# Altium PCB EXPLORER_V3.4.PcbDoc (part 2 of 4)
Units mm, origin at the board's own origin, x right, y up, seen from the top; angles counter-clockwise.
Board outline 160 x 121.01 mm, 2 copper layers (Top Layer, Bottom Layer); 254 components, 245 nets, 1181 pads, 772 vias.
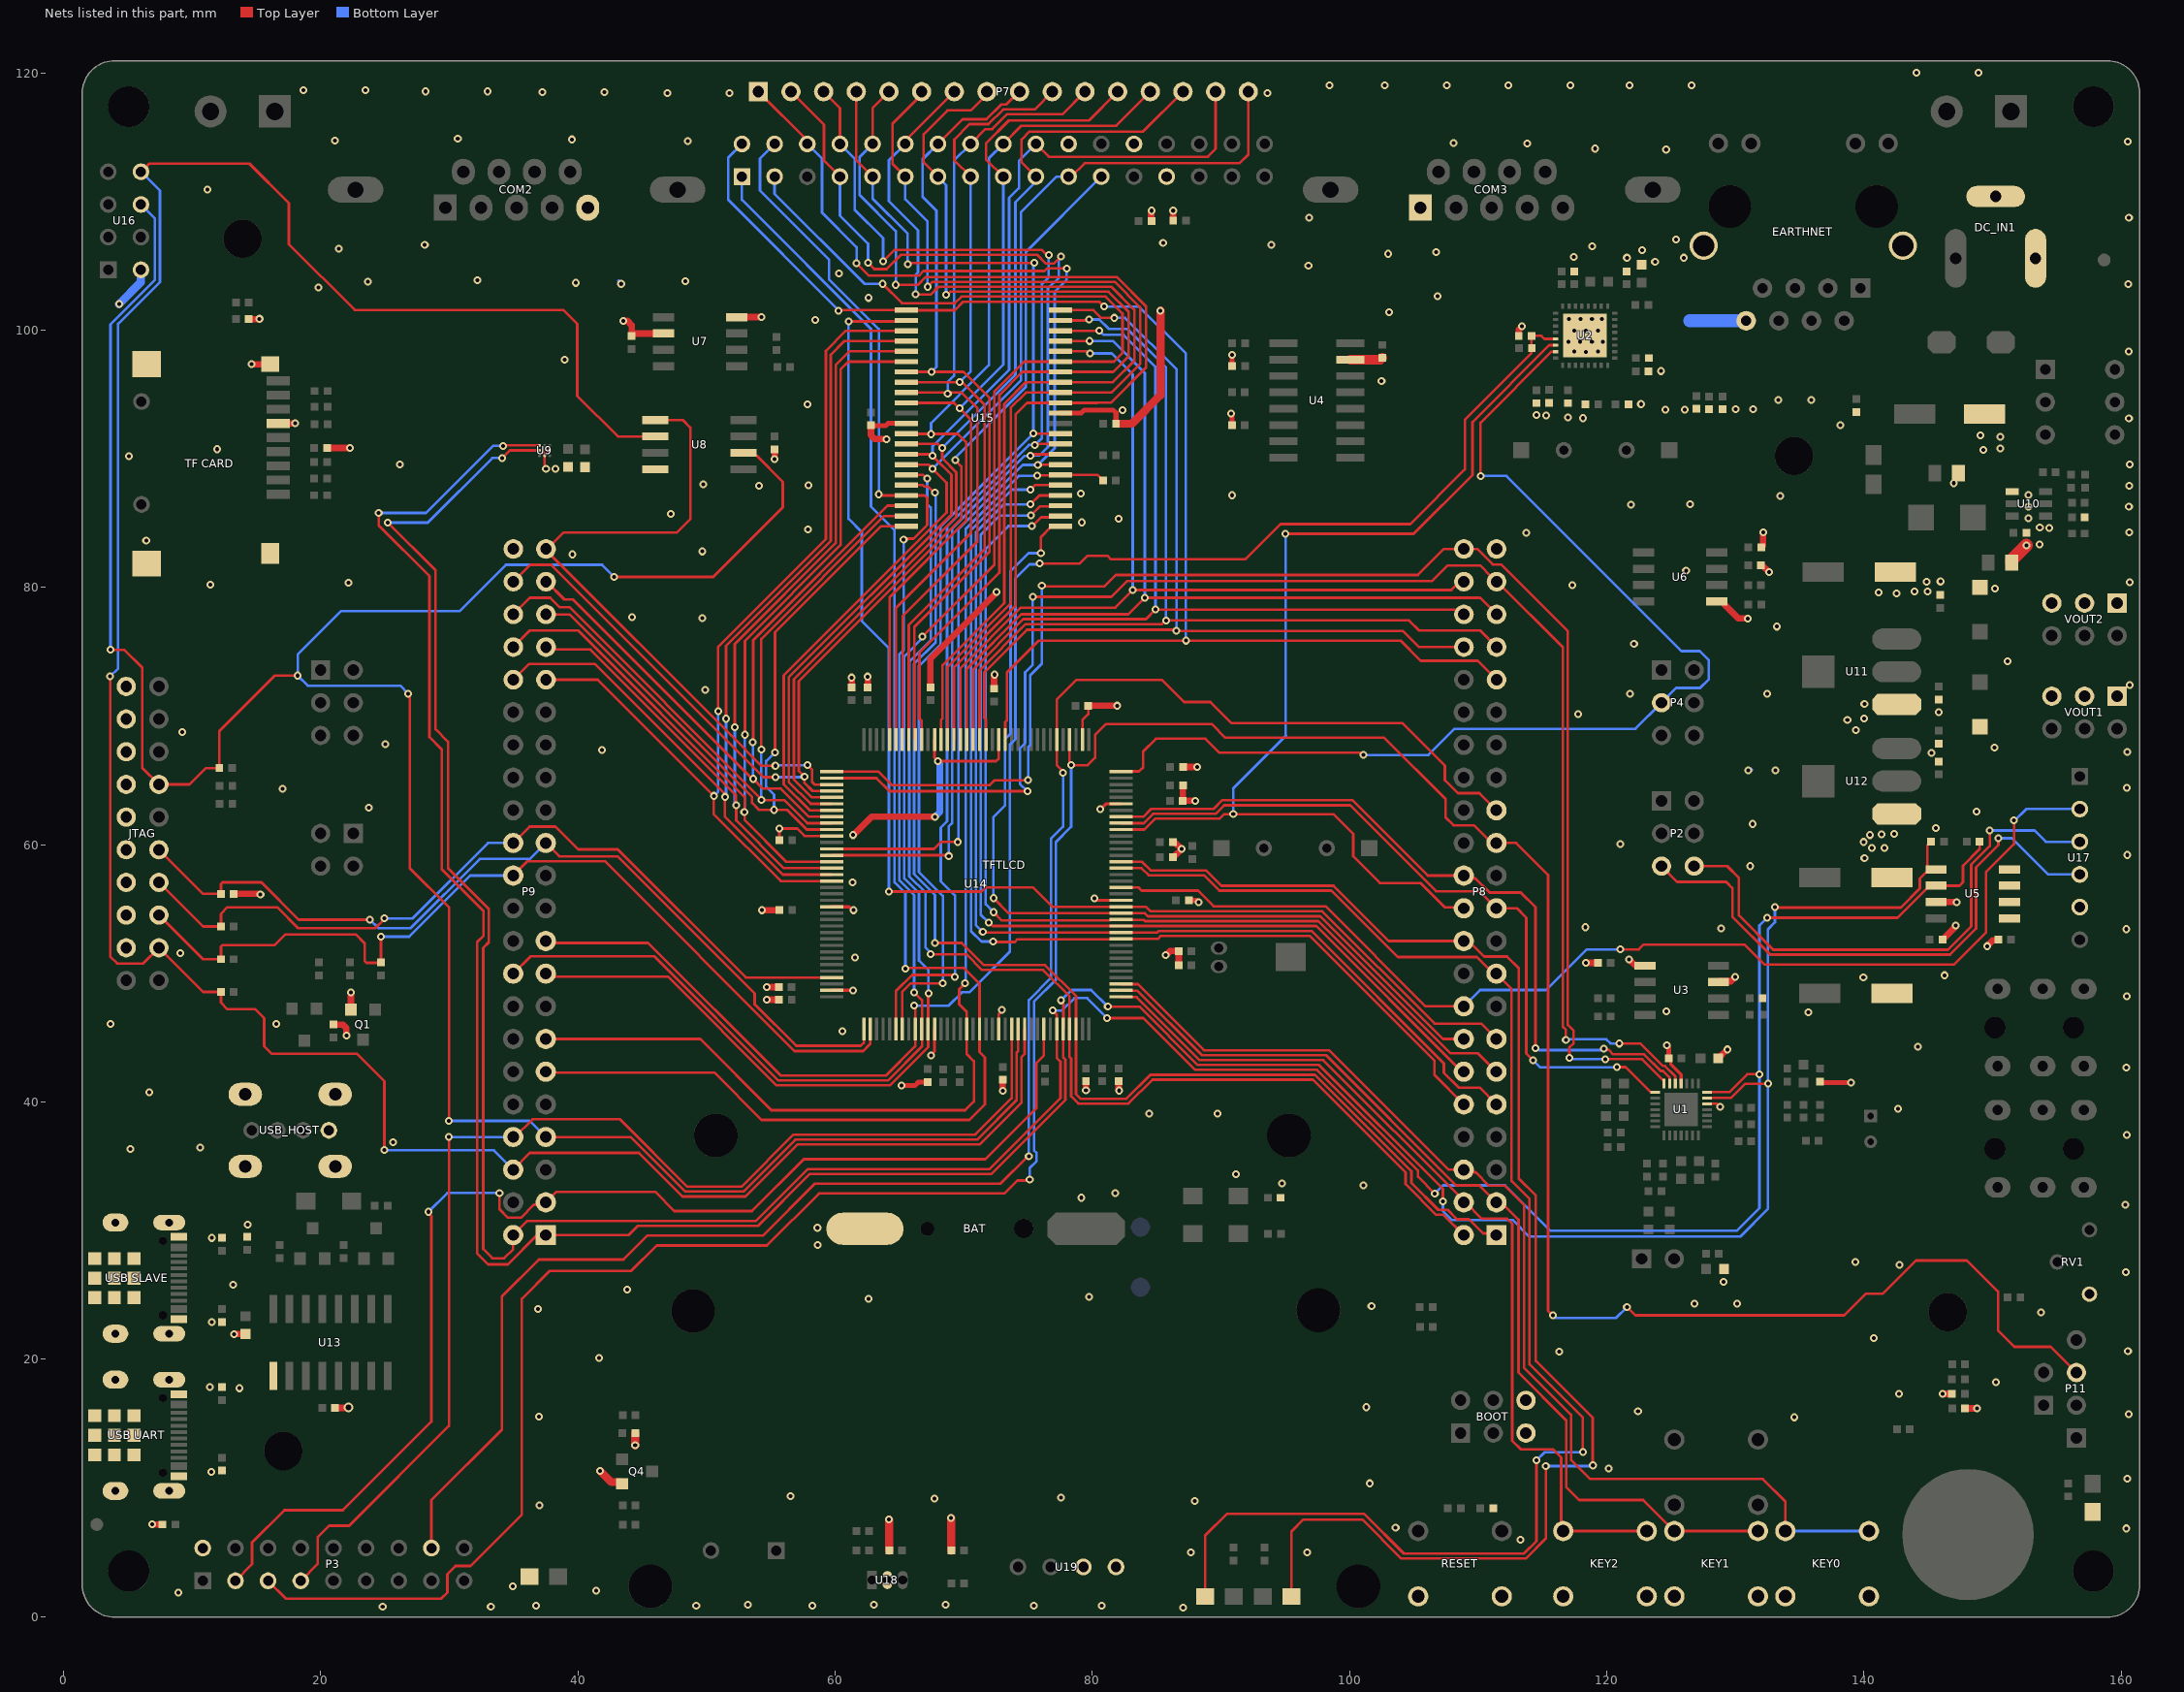
[diagram p2: the nets of this part, all layers, seen from the top]

## Via types
v1: diameter 0.61, hole 0.305, Top Layer to Bottom Layer, tented both sides, 732 vias
v2: diameter 0.762, hole 0.457, Top Layer to Bottom Layer, tented both sides, 23 vias
v3: diameter 0.6, hole 0.3, Top Layer to Bottom Layer, 12 vias
v4: diameter 0.7, hole 0.4, Top Layer to Bottom Layer, tented both sides, 5 vias

## Nets (pads, with @x,y where several pads share a name; then routed paths per layer and width w, separated by ;. In a path a pad name is that pad's centre, name@x,y a point inside that pad or via, vN(x,y) a via of type N, cw(c..) or ccw(c..) an arc to the next point about the centre after c; other vN are vias at no path point) (continued)
DCMI_HREF: P3.5 P8.25 P11.3 U14.40 | length 247.8
  Top Layer w0.203: P3.5@15.909,2.788 17.3,1.397 29.362,1.397 29.845,1.88 29.845,3.302 30.48,3.937 31.648,3.937 35.636,7.925 35.636,24.714 37.795,26.873 44.145,26.873 46.126,28.854 54.699,28.854 58.738,32.893 73.163,32.893 74.173,33.904 75.052,33.904 v1(75.128,33.98) ; U14.40@78.229,68.183 78.229,66.311 v1(78.348,66.192) 79.649,66.192 80.208,66.751 80.208,68.524 81.077,69.393 89.265,69.393 90.332,68.326 102.691,68.326 107.467,63.549 107.467,62.128 108.077,61.519 109.677,61.519 111.053,60.143 P8.25@111.419,60.143 112.958,60.143 115.443,57.658 115.443,23.774 v1(115.799,23.419) ; v1(121.564,24.079) 122.225,23.419 138.455,23.419 140.132,25.095 141.453,25.095 144.043,27.686 148.006,27.686 150.419,25.273 150.419,22.25 151.689,20.98 154.508,20.98 P11.3@156.515,18.974
  Bottom Layer w0.203: v1(75.128,33.98) 75.128,34.869 75.667,35.408 75.667,36.041 75.463,36.244 75.463,47.792 77.165,49.494 77.165,60.223 78.348,61.406 v1(78.348,66.192) ; v1(115.799,23.419) 116.002,23.216 120.701,23.216 v1(121.564,24.079)
DCMI_PCLK: P3.16 P8.27 U14.42 | length 143.8
  Top Layer w0.203: P3.16@28.609,5.328 28.609,9.051 34.087,14.529 34.087,24.892 36.957,27.762 43.536,27.762 45.39,29.616 54.384,29.616 58.422,33.655 72.847,33.655 74.981,35.789 v1(75.057,35.789) ; v1(77.724,65.608) 77.724,65.705 77.229,66.2 U14.42@77.229,68.183 77.229,71.285 78.765,72.822 85.404,72.822 87.131,71.095 89.179,71.095 90.805,69.469 104.095,69.469 107.417,66.147 107.417,65.024 108.433,64.008 110.094,64.008 P8.27@111.419,62.683
  Bottom Layer w0.203: v1(75.057,35.789) 75.057,47.924 76.784,49.652 76.784,60.477 77.724,61.417 v1(77.724,65.608)
DCMI_RESET: P3.7 P9.8 U14.132 | length 94.9
  Top Layer w0.203: P3.7@18.449,2.788 19.761,4.1 19.761,6.172 20.65,7.061 22.216,7.061 29.972,14.817 v1(29.972,37.287) ; P9.8@34.965,37.283 35.099,37.283 36.474,38.659 43.282,38.659 48.514,33.426 52.716,33.426 56.754,37.465 70.899,37.465 73.729,40.295 U14.132@73.729,45.683
  Bottom Layer w0.203: v1(29.972,37.287) 29.976,37.283 P9.8@34.965,37.283
DCMI_VSYNC: P3.3 P9.3 U14.137 | length 98.3
  Top Layer w0.203: P3.3@13.369,2.788 14.656,4.075 14.656,5.766 17.17,8.28 21.722,8.28 28.6,15.158 28.6,31.148 28.372,31.377 v1(28.372,31.471) ; v1(33.898,32.933) 33.898,31.663 34.548,31.013 35.56,31.013 36.558,32.012 37.313,32.012 38.322,33.02 45.999,33.02 47.498,31.521 53.527,31.521 57.566,35.56 71.688,35.56 75.634,39.506 75.634,43.029 76.229,43.624 U14.137@76.229,45.683
  Bottom Layer w0.203: v1(28.372,31.471) 29.834,32.933 v1(33.898,32.933)
ETH_MDC: P8.22 U2.22 U14.27 | length 84
  Top Layer w0.203: U14.27@82.229,61.183 84.037,61.183 84.88,62.027 89.891,62.027 90.246,62.382 98.73,62.382 100.279,60.833 100.279,59.106 102.357,57.028 105.506,57.028 107.398,55.137 108.806,55.137 P8.22@108.879,55.063 ; v1(95.021,84.176) 104.978,84.176 109.55,88.748 109.55,92.862 115.52,98.832 U2.22@115.914,98.832
  Bottom Layer w0.203: v1(90.957,62.408) 90.957,64.389 95.047,68.478 95.021,68.504 v1(95.021,84.176)
ETH_MDIO: P4.3 U2.23 U14.36 | length 88
  Top Layer w0.203: U14.36@82.229,65.683 82.252,65.706 83.628,65.706 83.947,66.025 83.947,67.259 84.938,68.25 88.791,68.25 89.884,67.158 100.787,67.158 101.092,66.853 v1(101.092,66.98) ; v1(110.185,88.671) 110.185,92.812 115.706,98.332 U2.23@115.914,98.332
  Bottom Layer w0.203: v1(101.092,66.98) 106.121,66.98 108.153,69.012 122.225,69.012 P4.3@124.257,71.044 125.4,72.187 127.254,72.187 127.94,72.873 127.94,74.346 127.229,75.057 125.806,75.057 112.192,88.671 v1(110.185,88.671)
ETH_RESET: C27.2 P9.19 R10.1 U2.21 U14.117 | length 128.9
  Top Layer w0.203: P9.19@37.505,52.523 37.654,52.375 45.45,52.375 55.762,42.062 63.952,42.062 66.229,44.339 U14.117@66.229,45.683 66.229,47.563 66.164,47.498 v1(66.142,47.498) ; v1(75.901,81.864) 79.019,81.864 79.629,82.474 81.178,82.474 81.458,82.194 91.897,82.194 94.64,84.938 104.724,84.938 108.966,89.179 108.966,93.04 114.148,98.222 114.148,99.568 114.91,99.568 115.146,99.332 U2.21@116.016,99.332
  Bottom Layer w0.203: v1(66.142,47.498) 68.834,47.498 69.875,48.539 70.434,48.539 73.584,51.689 73.584,67.773 74.016,68.204 74.016,80.696 75.125,81.806 75.842,81.806 v1(75.901,81.864)
F_CS: P9.43 U8.1 U14.75 | length 52.6
  Top Layer w0.203: P9.43@37.516,82.993 37.516,82.907 51.894,68.529 54.281,66.142 v1@55.345,66.142 ; P9.43@37.608,82.993 38.892,84.277 47.701,84.277 48.743,85.319 48.743,92.431 48.158,93.015 U8.1@46.025,93.015 ; v1(57.861,66.192) 58.217,65.837 58.217,64.864 58.397,64.683 U14.75@59.729,64.683
  Bottom Layer w0.203: v1(55.346,66.142) 55.396,66.192 v1(57.861,66.192)
FSMC_A0: P8.10 U14.10 U15.5 | length 84.4
  Top Layer w0.203: v1@72.352,52.413 72.39,52.451 73.965,52.451 74.168,52.654 81.889,52.654 81.918,52.683 U14.10@82.229,52.683 85.088,52.683 85.326,52.921 96.883,52.921 106.604,43.2 106.604,42.099 P8.10@108.879,39.823 ; v1(75.184,87.605) 75.539,87.959 U15.5@77.53,87.959
  Bottom Layer w0.203: v1(72.288,52.476) 71.375,52.476 70.561,53.291 70.561,84.428 73.738,87.605 v1(75.184,87.605)
FSMC_A1: P8.9 U14.11 U15.4 | length 85.1
  Top Layer w0.203: v1(71.476,53.238) 71.531,53.183 U14.11@82.229,53.183 85.049,53.183 85.168,53.302 97.04,53.302 107.34,43.002 107.34,42.266 108.483,41.123 110.12,41.123 P8.9@111.419,39.823 ; v1(75.184,86.462) 75.882,87.159 U15.4@77.53,87.159
  Bottom Layer w0.203: v1(71.476,53.238) 70.942,53.772 70.942,84.27 73.134,86.462 v1(75.184,86.462)
FSMC_A2: P8.12 U14.12 U15.3 | length 79.3
  Top Layer w0.203: v1(71.933,53.95) 71.989,53.95 72.255,53.683 U14.12@82.229,53.683 97.415,53.683 108.735,42.363 P8.12@108.879,42.363 ; v1(75.235,85.598) 75.947,86.31 77.48,86.31 U15.3@77.53,86.359
  Bottom Layer w0.203: v1(71.933,53.95) 71.323,54.559 71.323,84.099 72.822,85.598 v1(75.235,85.598)
FSMC_A3: P8.11 U14.13 U15.2 | length 79.8
  Top Layer w0.203: v1(72.314,54.762) 72.961,54.115 81.311,54.115 81.354,54.158 82.203,54.158 U14.13@82.254,54.209 ; v1(75.286,84.785) 75.286,84.734 76.012,85.461 77.431,85.461 U15.2@77.53,85.559 ; U14.13@82.229,54.183 82.254,54.158 83.138,54.158 83.143,54.153 83.998,54.153 84.086,54.064 97.573,54.064 107.847,43.79 109.993,43.79 P8.11@111.419,42.363
  Bottom Layer w0.203: v1(72.314,54.762) 71.704,55.372 71.704,83.007 73.482,84.785 v1(75.286,84.785)
FSMC_A4: P8.14 U14.14 U15.1 | length 73.1
  Top Layer w0.203: v1(72.314,55.855) 73.485,54.683 U14.14@82.229,54.683 84.077,54.683 84.315,54.445 97.731,54.445 107.272,44.903 P8.14@108.879,44.903 ; v1(75.997,82.677) 75.997,83.926 76.731,84.661 76.83,84.759 U15.1@77.53,84.759
  Bottom Layer w0.203: v1(72.314,55.855) 72.314,62.154 73.203,63.043 73.203,68.199 73.635,68.631 73.635,81.28 75.032,82.677 v1(75.997,82.677)
FSMC_A5: P8.13 U14.15 U15.24 | length 102.4
  Top Layer w0.203: v1(61.044,100.69) 65.405,100.69 65.502,100.787 U15.24@65.53,100.759 ; v1(64.186,56.363) 71.374,56.363 71.704,56.693 75.362,56.693 76.871,55.183 U14.15@82.229,55.183 84.161,55.183 84.518,54.826 97.888,54.826 106.614,46.101 110.221,46.101 P8.13@111.419,44.903
  Bottom Layer w0.203: v1(61.044,100.69) 61.044,85.341 62.078,84.308 62.078,77.394 64.211,75.26 64.186,75.235 v1(64.186,56.363)
FSMC_A6: P8.35 TFTLCD.2 U14.50 U15.23 | length 113.9
  Top Layer w0.203: v1(60.258,101.524) 60.293,101.559 U15.23@65.53,101.559 65.54,101.549 69.291,101.549 69.952,102.21 80.543,102.21 v1(80.899,101.854) ; U14.50@73.229,68.183 73.229,69.546 73.355,69.672 73.355,73.381 75.844,75.87 v1(87.274,75.87) 103.962,75.87 105.526,74.306 109.957,74.306 P8.35@111.43,72.833
  Bottom Layer w0.203: TFTLCD.2@52.754,114.484 51.689,113.419 51.689,110.134 60.258,101.566 v1(60.258,101.524) ; v1(80.899,101.854) 80.924,101.829 83.642,101.829 87.274,98.196 v1(87.274,75.87)
FSMC_A7: P8.38 U14.53 U15.22 | length 75.7
  Top Layer w0.203: U14.53@71.729,68.183 71.729,69.749 71.61,69.868 71.61,73.408 74.91,76.708 86.462,76.708 v1(86.538,76.632) 104.14,76.632 105.399,75.373 P8.38@108.89,75.373 ; U15.22@77.53,101.559 80.102,101.559 80.696,100.965 v1(81.712,100.965)
  Bottom Layer w0.203: v1(81.712,100.965) 82.55,100.965 86.538,96.977 v1(86.538,76.632)
FSMC_A8: P8.37 U14.54 U15.21 | length 77.5
  Top Layer w0.203: U14.54@71.229,68.183 71.229,73.566 74.814,77.151 85.403,77.151 85.697,77.445 104.623,77.445 105.41,76.657 110.145,76.657 P8.37@111.43,75.373 ; U15.21@77.53,100.759 79.567,100.759 79.646,100.838 v1(79.756,100.838)
  Bottom Layer w0.203: v1(79.756,100.838) 80.542,100.838 81.279,100.101 82.728,100.101 85.725,97.104 v1(85.725,77.445)
FSMC_A9: P8.40 U14.55 U15.20 | length 73.1
  Top Layer w0.203: U14.55@70.729,68.183 70.729,73.639 74.636,77.546 84.176,77.546 v1(84.912,78.283) 108.162,78.283 108.532,77.913 P8.40@108.89,77.913 ; U15.20@77.53,99.959 80.528,99.959 v1(80.543,99.974)
  Bottom Layer w0.203: v1(80.543,99.974) 80.874,99.644 82.423,99.644 84.912,97.155 v1(84.912,78.283)
FSMC_A10: P8.39 U14.56 U15.19 | length 74.6
  Top Layer w0.203: U14.56@70.229,68.183 70.229,73.678 74.478,77.927 82.804,77.927 v1(84.074,79.197) 110.145,79.197 P8.39@111.43,77.913 ; U15.19@77.53,99.159 79.779,99.159 v1(79.781,99.162)
  Bottom Layer w0.203: v1(79.781,99.162) 81.585,99.162 84.074,96.672 v1(84.074,79.197)
FSMC_A11: P8.42 U14.57 U15.18 | length 70.6
  Top Layer w0.203: U14.57@69.729,68.183 69.729,73.717 74.447,78.435 81.775,78.435 v1(83.134,79.794) 83.147,79.807 107.907,79.807 108.553,80.453 P8.42@108.89,80.453 ; U15.18@77.53,98.359 79.534,98.359 79.697,98.196 v1(79.807,98.196)
  Bottom Layer w0.203: v1(79.807,98.196) 81.509,98.196 83.134,96.571 v1(83.134,79.794)
FSMC_A12: P9.38 U14.87 U15.28 | length 76.7
  Top Layer w0.203: P9.38@34.976,75.373 36.26,76.657 40.03,76.657 52.959,63.729 52.959,61.925 56.201,58.683 U14.87@59.729,58.683 ; v1(52.984,68.555) 52.984,75.854 60.427,83.296 60.427,96.952 61.034,97.559 U15.28@65.53,97.559
  Bottom Layer w0.203: v1(52.934,62.535) 52.959,62.56 52.959,68.529 v1(52.984,68.555)
FSMC_A13: P9.37 U14.88 U15.27 | length 73.8
  Top Layer w0.203: P9.37@37.516,75.373 37.709,75.179 40.97,75.179 52.273,63.876 52.273,63.119 v1(52.311,63.081) 52.311,61.887 56.015,58.183 U14.88@59.729,58.183 ; v1@52.197,69.266 52.197,75.605 60.046,83.454 60.046,97.307 61.097,98.359 U15.27@65.53,98.359
  Bottom Layer w0.203: v1(52.197,69.139) 52.197,63.305 52.311,63.191 v1(52.311,63.081)
FSMC_A14: P9.36 U14.89 U15.26 | length 77.2
  Top Layer w0.203: P9.36@34.976,72.833 36.21,74.066 41.3,74.066 51.435,63.932 51.435,62.179 55.931,57.683 U14.89@59.729,57.683 ; v1(51.511,69.799) 51.511,75.458 59.665,83.611 59.665,98.095 60.729,99.159 U15.26@65.53,99.159
  Bottom Layer w0.203: v1(51.435,63.729) 51.511,63.805 v1(51.511,69.799)
FSMC_A15: P9.35 U14.90 U15.25 | length 74.6
  Top Layer w0.203: P9.35@37.516,72.833 41.544,72.833 v1(50.571,63.805) 50.546,63.779 50.546,62.408 55.771,57.183 U14.90@59.729,57.183 ; v1(50.902,70.383) 50.902,75.387 59.284,83.769 59.284,98.4 60.843,99.959 U15.25@65.53,99.959
  Bottom Layer w0.203: v1(50.571,63.805) 50.902,64.135 v1(50.902,70.383)
FSMC_A16: P9.41 U14.80 U15.42 | length 56.8
  Top Layer w0.203: P9.41@37.516,80.453 37.565,80.453 38.947,79.07 39.624,79.07 53.569,65.126 v1(53.619,65.126) 54.381,64.364 55.778,64.364 57.959,62.183 U14.80@59.729,62.183 ; v1(53.594,67.97) 53.625,68.001 53.625,75.906 64.078,86.359 U15.42@65.53,86.359
  Bottom Layer w0.203: v1(53.594,67.97) 53.645,67.92 53.619,67.894 v1(53.619,65.126)
FSMC_A17: P9.40 U14.81 U15.43 | length 60.3
  Top Layer w0.203: P9.40@34.976,77.913 36.26,79.197 37.846,79.197 38.57,78.473 39.332,78.473 54.28,63.525 v1(54.28,63.475) 56.042,63.475 57.833,61.683 U14.81@59.729,61.683 ; v1(54.254,67.412) 54.254,75.997 63.817,85.559 U15.43@65.53,85.559
  Bottom Layer w0.203: v1(54.254,67.412) 54.254,63.5 v1(54.28,63.475)
FSMC_A18: P9.39 U14.82 U15.44 | length 57.4
  Top Layer w0.203: P9.39@37.516,77.913 39.354,77.913 53.543,63.723 53.543,63.246 54.077,62.713 56.265,62.713 57.794,61.183 U14.82@59.729,61.183 ; v1(55.321,67.183) 55.321,76.525 63.556,84.759 U15.44@65.53,84.759
  Bottom Layer w0.203: v1(55.245,62.713) 55.245,63.906 54.635,64.516 54.635,66.497 v1(55.321,67.183)
FSMC_D0: P7.1 TFTLCD.6 U14.85 U15.7 | length 94
  Top Layer w0.203: P7.1@54.026,118.542 57.834,114.734 TFTLCD.6@57.834,114.484 ; U14.85@59.729,59.683 67.684,59.683 68.224,60.223 v1(69.545,60.223) ; v1(61.671,105.207) 62.636,104.242 66.507,104.242 66.863,104.597 76.276,104.597 76.479,104.8 v1(78.003,104.8) ; v1(75.768,89.535) 75.792,89.559 U15.7@77.53,89.559
  Bottom Layer w0.203: TFTLCD.6@57.834,114.484 58.979,113.339 58.979,109.144 61.671,106.451 v1(61.671,105.207) ; v1(69.545,60.223) 69.596,60.274 69.596,84.54 74.591,89.535 v1(75.768,89.535) 77.064,90.83 77.064,102.972 78.003,103.911 v1(78.003,104.8)
FSMC_D1: P7.2 TFTLCD.7 U14.86 U15.8 | length 94.1
  Top Layer w0.203: P7.2@56.566,118.542 59.131,115.976 59.131,113.182 TFTLCD.7@60.376,111.938 ; U14.86@59.729,59.183 68.782,59.183 v1(68.834,59.131) ; v1(62.56,105.232) 63.043,104.75 64.008,104.75 65.126,105.867 75.719,105.867 76.405,105.181 76.987,105.181 v1(77.546,105.74) ; v1@75.373,90.359 U15.8@77.53,90.359
  Bottom Layer w0.203: TFTLCD.7@60.376,111.938 60.376,108.915 62.56,106.731 v1(62.56,105.232) ; v1(68.834,59.131) 68.83,59.136 68.83,61.408 69.088,61.666 69.088,84.571 74.746,90.229 75.167,90.229 75.222,90.284 75.908,90.284 76.537,90.913 76.537,103.232 77.393,104.089 77.393,105.587 v1(77.546,105.74)
  other v1: 75.184,90.246
FSMC_D2: P7.3 TFTLCD.8 U14.114 U15.9 | length 99.1
  Top Layer w0.203: P7.3@59.106,118.542 60.376,117.272 TFTLCD.8@60.376,114.478 ; v1(63.729,105.359) 64.618,106.248 76.056,106.248 76.462,105.842 v1(76.606,105.842) ; U14.114@64.729,45.683 64.729,48.631 65.984,49.886 69.342,49.886 69.317,49.86 v1(69.317,49.733) ; v1(75.54,91.084) 75.614,91.159 U15.9@77.53,91.159
  Bottom Layer w0.203: TFTLCD.8@60.376,114.478 61.519,113.335 61.519,109.372 63.729,107.163 v1(63.729,105.359) ; v1(69.317,49.733) 69.317,56.058 68.22,57.154 68.22,61.337 68.707,61.824 68.707,84.729 75.062,91.084 v1(75.54,91.084) 76.073,91.618 76.073,103.581 76.606,104.115 v1(76.606,105.842)
FSMC_D3: P7.4 TFTLCD.9 U14.115 U15.10 | length 93.9
  Top Layer w0.203: P7.4@61.646,118.542 61.646,113.212 TFTLCD.9@62.914,111.944 ; U14.115@65.229,45.683 65.229,48.592 65.862,49.225 v1(68.377,49.225) ; v1(65.64,105.137) 65.735,105.232 v1(75.489,105.232) ; v1(75.413,91.973) 75.427,91.959 U15.10@77.53,91.959
  Bottom Layer w0.203: TFTLCD.9@62.914,111.944 62.914,110.238 65.64,107.512 v1(65.64,105.137) ; v1(68.377,49.225) 68.377,56.032 66.523,57.887 66.523,73.905 68.199,75.581 68.199,84.76 v1(75.413,91.973) 75.413,105.156 v1(75.489,105.232)
FSMC_D4: P7.5 TFTLCD.10 U14.58 U15.13 | length 81.5
  Top Layer w0.203: TFTLCD.10@62.914,114.484 62.914,117.27 P7.5@64.186,118.542 ; v1(64.719,103.53) 66.446,103.53 67.056,104.14 81.895,104.14 84.176,101.859 84.176,97.104 81.432,94.361 80.392,94.361 80.39,94.359 U15.13@77.53,94.359 74.928,94.359 74.034,93.465 74.034,78.581 69.229,73.775 U14.58@69.229,68.183
  Bottom Layer w0.203: TFTLCD.10@62.914,114.484 61.9,113.47 61.9,110.515 64.719,107.696 v1(64.719,103.53)
FSMC_D5: P7.6 TFTLCD.11 U14.59 U15.14 | length 78.4
  Top Layer w0.203: TFTLCD.11@65.454,111.944 64.465,112.932 64.465,116.078 66.726,118.339 P7.6@66.726,118.542 ; v1(67.183,103.378) 67.564,103.759 81.737,103.759 83.718,101.778 83.718,97.384 81.494,95.159 U15.14@77.53,95.159 74.839,95.159 73.653,93.973 73.653,78.739 68.729,73.814 U14.59@68.729,68.183
  Bottom Layer w0.203: TFTLCD.11@65.454,111.944 65.454,110.187 67.183,108.458 v1(67.183,103.378)
FSMC_D6: P7.7 TFTLCD.12 U14.60 U15.15 | length 80.5
  Top Layer w0.203: TFTLCD.12@65.454,114.484 65.454,114.73 P7.7@69.266,118.542 ; v1(66.269,102.794) 66.294,102.768 67.436,102.768 68.045,103.378 81.483,103.378 83.261,101.6 83.261,97.612 81.608,95.959 U15.15@77.53,95.959 74.826,95.959 73.149,94.282 73.149,78.773 68.348,73.972 68.348,69.817 68.229,69.698 68.224,69.698 68.224,68.188 U14.60@68.229,68.183
  Bottom Layer w0.203: TFTLCD.12@65.454,114.484 64.186,113.216 64.186,110.033 66.446,107.772 66.446,104.496 66.269,104.318 v1(66.269,102.794)
FSMC_D7: P7.8 TFTLCD.13 U14.63 U15.16 | length 78.8
  Top Layer w0.203: U14.63@66.729,68.183 66.729,69.618 66.548,69.799 66.548,74.93 72.768,81.15 72.768,94.968 74.56,96.759 U15.16@77.53,96.759 81.621,96.759 82.818,97.956 82.818,101.434 81.255,102.997 68.953,102.997 68.699,102.743 v1(68.631,102.743) ; TFTLCD.13@67.994,111.944 66.878,113.059 66.878,115.24 68.732,117.094 70.561,117.094 71.806,118.339 P7.8@71.806,118.542
  Bottom Layer w0.203: TFTLCD.13@67.994,111.944 67.994,111.903 68.631,111.266 v1(68.631,102.743)
FSMC_D8: P7.9 TFTLCD.14 U14.64 U15.29 | length 63.2
  Top Layer w0.203: U15.29@65.53,96.759 v1(67.488,96.759) 69.992,96.759 72.006,94.745 72.006,82.801 66.167,76.962 66.167,68.245 U14.64@66.229,68.183 ; TFTLCD.14@67.994,114.484 69.908,116.398 71.765,116.398 72.918,117.551 73.314,117.551 74.305,118.542 P7.9@74.346,118.542
  Bottom Layer w0.203: v1(67.488,96.759) 67.869,97.14 67.869,109.296 66.802,110.363 66.802,113.292 TFTLCD.14@67.994,114.484
FSMC_D9: P7.10 TFTLCD.15 U14.65 U15.30 | length 64.2
  Top Layer w0.203: U15.30@65.53,95.959 v1(69.686,95.959) 69.877,95.959 71.625,94.212 71.625,82.979 65.729,77.083 U14.65@65.729,68.183 ; TFTLCD.15@70.534,111.944 69.266,113.212 69.266,114.833 70.45,116.017 71.923,116.017 73.076,117.17 75.514,117.17 P7.10@76.886,118.542
  Bottom Layer w0.203: v1(69.686,95.959) 70.534,96.807 TFTLCD.15@70.534,111.944
FSMC_D10: P7.11 TFTLCD.16 U14.66 U15.31 | length 64.9
  Top Layer w0.203: U14.66@65.229,68.183 65.253,68.207 65.253,77.775 71.069,83.591 71.069,93.929 69.839,95.159 68.758,95.159 U15.31@65.53,95.159 ; TFTLCD.16@70.534,114.484 71.686,115.636 72.202,115.636 73.355,116.789 77.673,116.789 P7.11@79.426,118.542
  Bottom Layer w0.203: v1(68.758,95.072) 68.758,95.987 69.24,96.469 69.24,113.19 TFTLCD.16@70.534,114.484
FSMC_D11: P7.12 TFTLCD.17 U14.67 U15.32 | length 67.3
  Top Layer w0.203: U14.67@64.729,68.183 64.729,78.419 70.568,84.258 70.568,93.034 v1(69.674,93.928) 69.242,94.359 U15.32@65.53,94.359 ; TFTLCD.17@73.074,111.944 71.73,113.288 71.73,114.529 73.508,116.307 79.731,116.307 P7.12@81.966,118.542
  Bottom Layer w0.203: v1(69.674,93.928) 69.674,93.931 73.074,97.331 TFTLCD.17@73.074,111.944
FSMC_D12: P7.13 TFTLCD.18 U14.68 U15.35 | length 68.8
  Top Layer w0.203: U14.68@64.229,68.183 64.237,68.191 64.237,79.241 70.187,85.191 70.187,91.306 69.545,91.948 67.462,91.948 U15.35@65.278,91.948 ; TFTLCD.18@73.074,114.484 74.49,115.9 81.864,115.9 P7.13@84.506,118.542
  Bottom Layer w0.203: v1(67.462,91.923) 67.462,92.786 71.958,97.282 71.958,113.368 TFTLCD.18@73.074,114.484
FSMC_D13: P7.14 TFTLCD.19 U14.77 U15.36 | length 79.4
  Top Layer w0.203: U14.77@59.729,63.683 58.186,63.683 56.794,65.075 56.794,72.876 69.425,85.507 69.425,88.946 68.326,90.044 v1(68.326,90.856) 68.307,90.856 68.004,91.159 U15.36@65.53,91.159 ; TFTLCD.19@75.614,111.944 74.498,113.059 74.498,114.833 75.108,115.443 83.947,115.443 P7.14@87.046,118.542
  Bottom Layer w0.203: v1(68.326,90.856) 74.016,96.545 74.016,109.955 75.423,111.362 75.423,111.753 TFTLCD.19@75.614,111.944
FSMC_D14: P7.15 TFTLCD.20 U14.78 U15.37 | length 84
  Top Layer w0.203: U14.78@59.729,63.183 58.102,63.183 56.388,64.897 56.388,73.009 69.044,85.665 69.044,88.766 67.742,90.068 67.742,90.085 v1(67.578,90.249) 67.468,90.249 67.358,90.359 U15.37@65.53,90.359 ; TFTLCD.20@75.614,114.484 76.61,113.487 88.976,113.487 89.586,114.097 P7.15@89.586,118.542
  Bottom Layer w0.203: v1(67.578,90.249) 67.578,90.97 73.533,96.925 73.533,110.287 74.291,111.045 74.291,113.161 TFTLCD.20@75.614,114.484
FSMC_D15: P7.16 TFTLCD.21 U14.79 U15.38 | length 84.2
  Top Layer w0.203: U14.79@59.729,62.683 58.018,62.683 56.007,64.694 56.007,73.167 68.663,85.822 68.663,88.148 v1(67.581,89.23) 67.252,89.559 U15.38@65.53,89.559 ; TFTLCD.21@78.154,111.944 78.365,111.944 79.4,112.979 91.44,112.979 92.126,113.665 P7.16@92.126,118.542
  Bottom Layer w0.203: v1(67.581,89.23) 74.447,96.097 74.447,109.175 77.216,111.944 TFTLCD.21@78.154,111.944
FSMC_NBL0: P8.2 U14.141 U15.39 | length 97.3
  Top Layer w0.203: U15.39@65.53,88.759 66.835,88.759 67.126,88.468 v1(67.158,88.468) ; v1(67.412,51.511) 67.437,51.486 70.2,51.486 71.419,50.267 76.169,50.267 78.229,48.207 U14.141@78.229,45.683 78.229,43.514 78.348,43.395 78.348,40.448 78.918,39.878 82.809,39.878 84.672,41.74 97.155,41.74 104.361,34.534 104.361,33.622 106.742,31.242 107.3,31.242 P8.2@108.879,29.663
  Bottom Layer w0.203: v1(67.158,88.468) 67.158,86.487 67.437,86.208 67.437,75.897 65.761,74.22 65.761,57.546 67.031,56.276 67.031,52.002 67.412,51.621 v1(67.412,51.511)
FSMC_NBL1: P8.1 U14.142 U15.40 | length 98.7
  Top Layer w0.203: U15.40@65.53,87.959 66.804,87.959 66.905,87.859 67.19,87.859 67.672,87.376 v1(67.767,87.376) ; v1(67.767,52.375) 69.85,52.375 71.577,50.648 76.327,50.648 78.729,48.246 U14.142@78.729,45.683 78.729,40.606 79.076,40.259 82.652,40.259 84.514,42.121 97.312,42.121 104.809,34.625 104.809,33.714 106.899,31.623 107.62,31.623 108.356,30.886 109.296,30.886 110.395,29.788 111.295,29.788 P8.1@111.419,29.663
  Bottom Layer w0.203: v1(67.767,52.375) 67.767,56.103 66.142,57.729 66.142,74.062 67.818,75.739 67.818,87.155 67.597,87.376 v1(67.767,87.376)
FSMC_NE3: P9.13 R58.1 U14.125 U15.6 | length 93.6
  Top Layer w0.203: P9.13@37.505,44.903 49.508,44.903 55.042,39.37 70.11,39.37 70.79,40.05 70.79,43.18 70.229,43.741 U14.125@70.229,45.683 70.229,47.018 69.647,47.6 69.647,48.768 v1(70.104,49.225) ; v1(75.717,88.697) 75.743,88.722 77.493,88.722 U15.6@77.53,88.759 80.379,88.759 R58.1@80.823,88.316
  Bottom Layer w0.203: v1(70.104,49.225) 70.155,49.276 70.155,84.56 74.267,88.672 75.693,88.672 v1(75.717,88.697)
FSMC_NE4: P9.11 TFTLCD.1 U14.127 | length 118.9
  Top Layer w0.203: P9.11@37.505,42.363 37.577,42.291 50.602,42.291 54.285,38.608 70.425,38.608 71.649,39.831 71.649,43.465 71.229,43.885 U14.127@71.229,45.683 71.229,49.218 70.028,50.419 65.498,50.419 v1(65.456,50.377)
  Bottom Layer w0.203: TFTLCD.1@52.754,111.944 52.754,110.136 62.789,100.101 62.789,86.284 64.618,84.455 64.618,57.072 65.456,56.234 v1(65.456,50.377)
FSMC_NOE: P9.18 TFTLCD.4 U14.118 U15.41 | length 117.5
  Top Layer w0.203: P9.18@34.965,49.983 36.315,51.333 45.952,51.333 55.604,41.681 64.11,41.681 66.751,44.323 66.751,47.93 v1(66.142,48.539) ; v1(63.398,87.249) 63.449,87.198 63.449,87.159 U15.41@65.53,87.159 66.968,87.159 67.158,86.97 67.158,84.856 66.096,83.795 65.405,83.795 v1(65.329,83.718)
  Bottom Layer w0.203: TFTLCD.4@55.294,114.484 54.153,113.343 54.153,110.871 59.538,105.486 59.538,103.937 63.398,100.076 v1(63.398,87.249) ; v1(65.329,83.718) 65.329,75.147 64.999,74.816 64.999,57.23 66.142,56.087 v1(66.142,48.539)
FSMC_NWE: P9.17 TFTLCD.3 U14.119 U15.17 | length 136.3
  Top Layer w0.203: P9.17@37.505,49.983 37.73,49.759 46.988,49.759 55.447,41.3 64.267,41.3 67.229,44.262 U14.119@67.229,45.683 67.229,48.433 v1(67.259,48.463) ; v1(63.703,103.607) 65.202,102.108 69.311,102.108 69.819,102.616 81.026,102.616 82.347,101.295 82.347,98.222 81.684,97.559 U15.17@77.53,97.559 74.699,97.559 72.387,95.247 72.387,81.785 v1(66.777,76.175)
  Bottom Layer w0.203: TFTLCD.3@55.294,111.944 55.294,110.594 62.281,103.607 v1(63.703,103.607) ; v1(66.777,76.175) 66.896,76.175 65.38,74.659 65.38,57.388 66.523,56.245 66.523,51.003 67.259,50.267 v1(67.259,48.463)
GBC_KEY: P8.16 U14.18 U17.2 | length 89.8
  Top Layer w0.203: U14.18@82.229,56.683 83.576,56.683 83.82,56.439 88.214,56.439 89.433,55.22 98.128,55.22 105.905,47.443 P8.16@108.879,47.443 ; v1(121.06,51.867) 122.479,51.867 122.86,52.248 130.708,52.248 132.258,50.698 147.006,50.698 149.479,53.171 149.479,57.861 151.663,60.046 v1(151.663,61.9)
  Bottom Layer w0.203: P8.16@108.879,47.443 110.153,48.717 115.291,48.717 118.44,51.867 v1(121.06,51.867) ; v1(151.663,61.9) 151.74,61.9 152.618,62.778 U17.2@156.78,62.778
GBC_RX: P2.6 U17.3 | length 42.1
  Top Layer w0.203: P2.6@126.797,58.344 129.362,58.344 130.277,57.429 130.277,54.508 132.944,51.841 146.533,51.841 148.336,53.645 148.336,58.465 149.784,59.913 v1(149.784,61.112)
  Bottom Layer w0.203: v1(149.784,61.112) 153.264,61.112 154.138,60.238 U17.3@156.78,60.238
GBC_TX: P2.5 U17.4 | length 44.7
  Top Layer w0.203: P2.5@124.257,58.344 125.476,57.125 129.286,57.125 129.769,56.642 129.769,54.407 132.715,51.46 146.69,51.46 148.717,53.487 148.717,58.248 150.444,59.975 v1(150.444,60.503)
  Bottom Layer w0.203: v1(150.444,60.503) 151.511,60.503 154.316,57.698 U17.4@156.78,57.698
GND: "TF CARD.6" "TF CARD.10" "TF CARD.11" "TF CARD.12" "TF CARD.13" "USB SLAVE.1" "USB SLAVE.12" "USB SLAVE.SH1" "USB SLAVE.SH2" "USB SLAVE.SH3" "USB SLAVE.SH4" "USB UART.1" "USB UART.12" "USB UART.SH1" "USB UART.SH2" "USB UART.SH3" "USB UART.SH4" BAT.2 BOOT.5 BOOT.6 C1.1 C2.1 C7.1 C8.2 C9.1 C24.1 C25.1 C26.1 C27.1 C28.1 C29.1 C30.2 C31.2 C32.1 C33.1 C34.1 C35.1 C36.2 C37.2 C39.2 C41.1 C42.1 C43.1 C44.1 C45.2 C46.2 C47.1 C48.1 C49.1 C52.2 C53.1 C54.1 C55.2 C56.1 C57.2 C58.1 C59.1 C60.1 C61.2 C62.1 C63.1 C64.2 C65.1 C66.1 C67.1 C68.1 C69.2 C70.2 C71.1 C72.1 C73.2 C74.1 C75.1 C76.1 C77.1 C78.1 C79.1 C80.1 C81.1 C82.1 C83.1 C84.1 C85.1 C86.1 C87.1 C88.1 C89.1 C90.2 C91.1 C92.1 C93.2 C94.2 C95.2 COM2.5 COM3.1 D2.1 D3.1 DC_IN1.2 DC_IN1.3 EARTHNET.8 EARTHNET.13 EARTHNET.14 JTAG.4 JTAG.6 JTAG.8 JTAG.10 JTAG.12 JTAG.14 JTAG.16 JTAG.18 JTAG.20 KEY0.1 KEY1.1 KEY2.1 LS1.1 P3.2 P8.43 P9.44 PWR.2 Q1.1 Q4.1 R1.2 R6.1 R8.1 R11.2 R15.2 R16.2 R24.2 R33.2 R34.2 R44.2 R45.2 R46.2 R54.2 R63.2 R65.2 RESET.2 RV1.1 TFTLCD.22 TFTLCD.26 TFTLCD.27 U1.4 U1.26 U2.33 U3.1 U3.7 U4.15 U5.1 U5.2 U5.3 U5.4 U5.7 U6.5 U7.2 U7.8 U8.4 U9.A2 U9.B1 U10.1 U11.1 U12.1 U13.1 U14.16 U14.31 U14.38 U14.51 U14.61 U14.83 U14.94 U14.107 U14.120 U14.130 U15.12 U15.34 U16.1 U17.5 U18.2 U19.3 U19.4 USB_HOST.4 USB_HOST.5 USB_HOST.6 USB_HOST.7 USB_HOST.8 VOUT1.1 VOUT1.3 VOUT1.5 VOUT2.1 VOUT2.3 VOUT2.5 | length 161.1
  Top Layer w0.203: v1(37.516,89.23) 37.414,89.332 U9.A2@37.414,90.253 37.414,90.5 37.567,90.653 U9.B1@37.814,90.653 ; C78.1@55.661,60.376 55.661,61.255 v1(55.651,61.265) 57.048,61.265 57.63,60.683 U14.83@59.729,60.683 ; v1(67.462,43.612) 67.462,43.663 67.729,43.929 U14.120@67.729,45.683 ; U14.61@67.729,68.183 67.729,66.764 v1(67.996,66.497) 72.517,66.497 72.729,66.709 U14.51@72.729,68.183 ; U14.130@72.729,45.683 72.729,46.848 72.974,47.093 v1(72.974,47.168) ; U14.38@79.229,68.183 79.229,69.694 79.68,70.145 C77.1@79.68,70.815 ; v1(80.162,55.829) 80.308,55.683 U14.16@82.229,55.683 ; U1.26@127.806,39.871 128.557,39.871 v1(128.803,39.624)
  Top Layer w0.254: v1@10.592,36.449 v1(10.617,36.449) ; v1(49.886,72.034) v1@49.962,72.034 ; v1@54.051,87.909 v1(54.077,87.909) ; U14.107@59.729,48.683 v1(61.383,48.683) ; U14.94@59.729,55.183 61.091,55.183 61.359,54.915 v1(61.417,54.915) ; v1(80.62,62.763) 81.039,63.183 U14.31@82.229,63.183 ; C1.1@124.816,43.409 124.975,43.25 124.975,42.937 125.781,42.13 U1.4@125.781,41.446
  Top Layer w0.381: v1@30.632,114.884 v1(30.658,114.884) ; C88.1@62.789,92.608 62.814,92.583 63.932,92.583 64.108,92.759 U15.34@65.53,92.759 ; v1(65.176,41.275) 66.203,41.275 66.483,41.554 C85.1@67.183,41.554 ; U15.12@77.53,93.559 79.132,93.559 79.375,93.802 81.616,93.802 81.839,93.579 C89.1@81.839,92.735 ; v1@81.737,32.918 v1(81.788,32.918) ; C83.1@87.503,55.677 88.114,55.677 v1(88.266,55.524) ; v1(90.791,93.534) 90.856,93.47 C41.1@90.856,92.634 ; v1(90.856,98.095) 90.872,98.079 C39.2@90.872,97.206 ; v1(118.872,106.528) v1@118.872,106.553 ; v1@118.999,114.021 v1(119.101,114.122) ; v1(124.663,44.425) 124.663,44.363 124.816,44.21 C1.1@124.816,43.409 ; R1.2@136.576,41.596 136.643,41.529 v1(138.989,41.529) ; v1(142.773,27.33) v1@142.835,27.33
  Top Layer w0.508: v1(6.883,7.188) 6.909,7.163 C36.2@7.687,7.163 ; R63.2@13.243,56.185 15.265,56.185 v1(15.316,56.134) ; v1(13.259,21.946) 13.284,21.971 C63.1@14.148,21.971 ; C92.1@14.402,100.863 v1@15.265,100.863 ; v1(14.63,97.358) 16.061,97.358 ; 16.688,92.758 18.031,92.758 18.029,92.761 v1(18.009,92.761) ; C44.1@20.498,90.856 v1(22.276,90.856) ; C49.1@21.006,46.025 21.699,46.025 21.996,45.727 v1(21.996,45.177) ; C64.2@21.117,16.231 22.123,16.231 v2(22.149,16.256) ; Q1.1@22.342,47.2 22.342,48.504 v1(22.352,48.514) ; v1(43.536,100.736) 43.555,100.717 43.858,100.717 44.183,100.392 C45.2@44.183,99.585 ; C45.2@44.183,99.539 44.39,99.746 U7.2@46.66,99.746 ; U7.8@52.36,101.016 v1(54.254,101.016) ; v1(54.305,54.915) C76.1@55.661,54.915 ; v1(54.686,47.955) C86.1@55.626,47.955 ; v1(54.686,48.946) C70.2@55.617,48.946 ; v1(55.296,89.992) C46.2@55.296,90.745 ; v1@60.3,104.369 v1(60.3,104.419) ; C79.1@61.29,72.238 v1(61.29,73) ; v1(61.392,60.757) 61.392,60.731 62.84,62.179 v1(67.767,62.179) ; C69.2@62.535,72.247 v1(62.535,73.076) ; C88.1@62.789,92.608 62.789,91.839 63.086,91.542 v1(64.008,91.542) ; C80.1@67.412,72.238 67.412,74.473 72.539,79.601 v1(72.539,79.653) ; C81.1@72.365,72.136 72.365,73.203 v1(72.39,73.228) ; v1(73.025,40.869) C87.1@73.025,41.732 ; v1(79.502,40.919) R54.2@79.502,41.621 ; C77.1@79.68,70.815 v1(81.94,70.815) ; C84.1@82.042,41.621 82.042,40.919 v1(82.067,40.894) ; C90.2@84.545,108.525 84.568,108.525 84.572,108.529 84.572,109.208 84.633,109.269 84.607,109.294 v1(84.607,109.296) ; v1(85.7,51.435) 85.727,51.435 86.032,51.74 86.67,51.74 C74.1@86.716,51.74 C75.1@86.716,50.622 ; C68.1@86.258,59.055 86.304,59.101 86.381,59.101 v1(86.944,59.665) 86.431,60.177 86.304,60.177 C67.1@86.258,60.223 ; C91.1@86.284,108.509 v1(86.284,109.296) ; C66.1@87.046,64.618 87.046,63.44 C82.1@87.03,63.424 v1(88.011,63.424) ; C72.1@87.046,66.065 87.055,66.057 v1(88.141,66.057) ; C27.1@113.157,99.568 113.157,100.051 v1(113.411,100.305) ; v1(118.364,50.825) C26.1@119.304,50.825 ; v1(121.742,51.079) 122.161,50.66 122.923,50.66 U3.1@122.987,50.597 ; U6.5@128.56,78.918 129.068,78.918 129.131,78.854 129.131,78.717 130.251,77.597 v1(130.962,77.597) ; C2.1@128.676,43.409 129.362,44.094 v1(129.388,44.094) ; U3.7@128.687,49.327 128.75,49.39 129.654,49.39 v1(129.997,49.733) ; R24.2@131.988,81.712 132.039,81.763 v1(132.613,81.188) ; C43.1@132.004,83.109 132.156,83.261 v1(132.156,84.277) ; U5.7@145.608,55.55 v1(147.193,55.55) ; C42.1@146.101,52.629 146.147,52.675 147.123,53.651 147.123,53.702 v1(147.142,53.721) ; v1(146.126,17.323) C34.1@146.847,17.323 ; C35.1@147.863,16.18 v1(148.793,16.18) ; v1(149.581,52.121) 150.043,52.583 150.389,52.583 C93.2@150.435,52.629
  Top Layer w0.635: v1(41.732,11.328) 42.601,10.46 43.295,10.46 Q4.1@43.427,10.328 ; v1(44.45,13.31) 44.459,13.319 R65.2@44.459,14.249 ; v1(64.186,7.544) 64.202,7.528 C94.2@64.202,5.131 ; v1(69.012,7.671) 69.028,7.655 C95.2@69.028,5.131 ; C89.1@81.953,92.735 83.083,92.735 85.292,94.944 v1(85.292,101.524)
  Top Layer w0.762: U4.15@100.06,97.714 102.397,97.714 C37.2@102.54,97.857
  Top Layer w1.016: C58.1@151.486,81.939 151.486,82.144 v1(152.629,83.287)
  Bottom Layer w0.254: v1@16.535,45.949 v1(16.535,46.076) ; v1@32.156,103.886 v1(32.182,103.886) ; v1@43.18,103.835 43.358,103.657 v1(43.358,103.607) ; v1(60.554,45.517) v1@60.579,45.517 ; v1@62.56,24.714 v1(62.586,24.714)
  Bottom Layer w0.381: v1(21.107,114.757) v1@21.158,114.757 ; v1@22.098,80.289 v1(22.174,80.366) ; v1@39.497,114.833 v1(39.522,114.833) ; v1(82.347,93.777) v1@82.347,93.828 ; v1(84.404,39.091) v1@84.404,39.218 ; v1@101.041,33.553 v1(101.067,33.528) ; v1(102.997,105.943) v1@102.997,105.969 ; v1@103.048,101.397 v1(103.073,101.397) ; v1@106.731,106.045 v1(106.731,106.07) ; v1(113.817,114.503) v1@113.843,114.503 ; v1@126.162,81.28 v1(126.162,81.305) ; v1@128.905,53.467 v1(128.905,53.492) ; v1(131.013,65.786) 131.064,65.837 v1@131.191,65.837
  Bottom Layer w0.508: v1(62.611,102.514) v1@62.636,102.514 ; v1(67.767,62.179) 68.134,62.546 68.134,66.331 67.996,66.47 v1(67.996,66.497)
  Bottom Layer w0.635: v1(4.318,102.032) 4.318,102.042 5.972,103.695 5.982,103.695 6.02,103.734 U16.1@6.02,104.699
  Bottom Layer w1.016: 126.441,100.736 EARTHNET.8@130.84,100.736
  other v1: 87.046,0.711 24.816,0.762 33.223,0.787 49.2,0.838 80.721,0.838 36.754,0.864 58.217,0.864 75.463,0.864 53.213,0.914 63.017,0.914 68.605,0.94 8.941,1.854 41.427,2.032 34.95,2.362 87.655,5.004 96.698,5.004 113.284,5.969 160.401,6.858 103.581,6.909 37.008,8.661 87.96,8.992 67.716,9.169 77.572,9.246 56.515,9.373 101.575,10.363 160.477,10.719 120.142,11.506 134.569,15.494 36.957,15.545 160.579,15.748 122.428,15.951 101.295,16.281 142.723,17.323 13.665,17.755 11.379,17.831 150.266,18.237 41.656,20.117 116.307,20.599 160.528,20.65 140.767,21.641 11.532,22.885 153.772,23.647 36.881,23.901 101.702,24.13 126.822,24.333 130.124,24.333 79.756,24.867 43.815,25.425 13.183,25.806 129.083,26.035 160.35,26.772 139.344,27.584 58.649,28.88 11.532,29.439 58.623,30.226 14.326,30.48 160.325,32.004 79.146,32.563 94.742,33.68 91.161,34.392 5.207,36.347 25.639,36.891 160.426,37.44 89.738,39.116 142.646,39.472 6.655,40.767 160.401,42.672 144.196,44.298 3.658,46.076 135.661,46.965 124.638,47.041 160.426,48.209 139.954,49.682 146.253,49.86 61.544,51.232 9.068,51.562 160.401,53.442 118.339,53.594 61.341,57.074 131.14,58.344 140.03,58.953 160.477,59.207 140.614,59.741 141.605,59.741 121.056,60.046 139.979,60.223 140.462,60.757 141.351,60.808 142.342,60.833 145.593,61.316 131.343,61.62 148.768,62.586 23.749,62.89 17.043,64.364 160.452,64.44 133.121,65.786 145.237,67.132 160.477,67.208 41.859,67.361 150.139,67.564 25.019,67.818 9.246,68.758 139.37,68.91 138.709,69.698 140.005,69.825 117.78,70.155 145.821,70.307 140.03,70.942 121.818,71.755 132.486,71.755 160.655,72.415 151.155,74.27 122.123,75.616 133.223,76.962 49.682,77.622 44.221,77.699 142.519,79.553 141.148,79.629 144.958,79.68 143.916,79.705 150.19,79.934 117.323,80.188 11.43,80.213 160.655,80.416 144.856,80.442 145.948,80.467 39.573,82.575 49.682,82.804 153.661,83.341 6.426,83.642 113.741,84.252 160.63,84.303 57.887,84.506 154.398,84.637 153.67,84.658 79.172,85.065 82.042,85.344 152.772,85.373 47.219,85.725 152.772,86.288 160.604,86.284 121.895,86.436 126.492,86.487 133.477,87.122 90.856,87.173 152.798,87.202 79.121,87.3 160.63,87.909 57.937,87.935 49.759,88.011 146.978,88.116 38.252,89.23 26.162,89.56 160.655,89.56 5.08,90.221 149.267,90.682 11.938,90.754 150.613,90.809 150.613,91.723 149.064,91.825 138.176,92.608 160.604,93.142 118.135,93.167 116.967,93.218 115.291,93.37 114.529,93.396 124.562,93.828 126.06,93.828 130.023,93.853 131.394,93.878 57.836,94.234 122.657,94.259 133.35,94.564 135.89,94.564 102.489,96.063 124.206,96.825 38.964,97.714 118.389,98.323 117.475,98.349 119.304,98.349 160.579,98.349 117.018,99.111 117.932,99.111 118.847,99.111 119.685,99.111 117.475,99.974 118.364,99.974 119.329,99.974 58.445,100.787 117.069,100.863 117.958,100.863 118.847,100.863 119.634,100.863 15.24,100.889 106.832,102.641 19.812,103.327 160.553,103.581 39.827,103.683 23.673,103.784 48.362,103.81 96.799,105.029 123.749,105.308 121.564,105.639 125.984,105.639 117.45,105.689 122.758,106.223 21.412,106.35 28.092,106.629 93.929,106.655 85.496,106.782 125.374,107.061 96.85,108.763 160.604,108.763 11.201,110.922 124.612,114.046 108.077,114.554 160.503,114.681 48.539,114.706 46.965,118.44 51.791,118.44 93.624,118.44 37.236,118.516 42.062,118.516 28.143,118.567 32.969,118.567 18.644,118.669 23.47,118.669 98.45,119.024 102.743,119.024 107.569,119.024 112.344,119.024 117.17,119.024 121.768,119.024 126.594,119.024 144.069,120.015 148.895,120.015
  other v3: 11.506,11.252
I2S_LRCK: P8.44 U1.7 U14.73 | length 118.1
  Top Layer w0.203: U14.73@59.729,65.683 63.374,65.683 64.414,64.643 72.034,64.643 72.415,65.024 v1(75.006,65.024) ; v1(76.073,80.137) 76.124,80.086 80.924,80.086 81.813,80.975 105.308,80.975 107.326,82.993 P8.44@108.89,82.993 109.92,82.993 111.125,81.788 111.785,81.788 116.967,76.606 116.967,45.999 117.424,45.542 117.424,44.583 117.094,44.252 v1(117.094,43.434) ; v1(119.888,43.332) 122.747,43.332 124.361,41.719 124.417,41.719 124.431,41.706 U1.7@124.431,41.446
  Bottom Layer w0.203: v1(75.006,65.024) 75.006,67.579 75.159,67.731 75.159,73.152 76.073,74.066 v1(76.073,80.137) ; v1(117.094,43.434) 117.094,43.383 117.043,43.332 v1(119.888,43.332)
I2S_SCLK: P8.41 U1.5 U14.74 | length 117.2
  Top Layer w0.203: U14.74@59.729,65.183 63.214,65.183 64.237,64.16 v1(74.955,64.16) ; v1(75.362,79.273) 81.483,79.273 82.702,80.493 106.401,80.493 107.62,81.712 110.171,81.712 111.043,80.839 P8.41@111.43,80.453 111.495,80.453 116.586,75.362 116.586,45.842 116.815,45.613 v1(116.815,44.835) ; v1(120.98,44.552) 122.606,44.552 124.354,42.804 124.533,42.804 125.331,42.006 U1.5@125.331,41.446
  Bottom Layer w0.203: v1(74.955,64.16) 74.371,64.745 74.371,67.482 74.778,67.889 74.778,73.406 75.362,73.99 v1(75.362,79.273) ; v1(116.815,44.835) 116.861,44.882 119.964,44.882 120.294,44.552 v1(120.98,44.552)
I2S_SDIN: P8.24 U1.6 U14.29 | length 59.1
  Top Layer w0.203: U14.29@82.229,62.183 83.951,62.183 84.557,62.789 89.428,62.789 90.114,63.475 100.204,63.475 106.076,57.603 P8.24@108.879,57.603 109.098,57.384 109.798,57.384 110.896,56.286 113.309,56.286 114.452,55.143 v1(114.452,44.196) ; v1(119.786,44.145) 119.864,44.067 120.144,44.067 120.498,43.713 122.905,43.713 124.201,42.418 124.38,42.418 124.867,41.93 124.867,41.459 U1.6@124.881,41.446
  Bottom Layer w0.203: v1(114.452,44.196) 114.562,44.196 114.715,44.044 119.575,44.044 119.676,44.145 v1(119.786,44.145)
I2S_SDOUT: P8.21 U1.8 U14.28 | length 57.5
  Top Layer w0.203: U14.28@82.229,61.683 83.998,61.683 84.722,62.408 89.586,62.408 90.246,63.068 100.051,63.068 106.731,56.388 110.094,56.388 P8.21@111.419,55.063 113.008,55.063 113.741,54.331 113.741,43.79 v1(114.275,43.256) ; v1(120.777,42.723) 121.463,42.723 123.401,40.784 123.742,40.784 U1.8@123.756,40.771
  Bottom Layer w0.203: v1(114.275,43.256) 114.833,42.697 120.752,42.697 v1(120.777,42.723)
IIC_SCL: P9.2 R25.1 U1.28 U5.6 U9.B3 U14.139 | length 244
  Top Layer w0.203: v1(25.222,85.039) 28.931,81.331 28.931,68.986 29.896,68.021 29.896,58.191 33.071,55.016 33.071,52.426 32.639,51.994 32.639,28.575 33.35,27.864 34.265,27.864 34.965,28.564 P9.2@34.965,29.663 36.061,30.759 53.843,30.759 57.881,34.798 72.004,34.798 77.521,40.315 77.521,43.144 77.229,43.436 U14.139@77.229,45.683 77.241,45.696 77.241,46.795 76.919,47.117 v1(76.911,47.117) ; v1(34.112,90.068) 34.696,90.653 U9.B3@37.014,90.653 ; v1(81.153,46.533) 83.967,46.533 87.997,42.502 97.47,42.502 105.321,34.651 105.321,34.201 v1(106.634,32.888) ; U1.28@127.806,40.771 129.518,40.771 130.912,42.164 v1(131.877,42.164) ; v1(132.461,54.331) 142.611,54.331 145.1,56.82 147.422,56.82 147.701,57.099 147.701,58.369 148.996,59.665 R25.1@148.996,60.249
  Bottom Layer w0.203: v1(25.222,85.039) 28.321,85.039 33.35,90.068 v1(34.112,90.068) ; v1(76.911,47.117) 77.646,47.117 78.612,48.082 79.604,48.082 v1(81.153,46.533) ; v1(106.634,32.888) 107.275,33.528 112.09,33.528 115.621,29.997 130.099,29.997 131.865,31.763 v1@131.865,42.164 ; v1(131.877,42.164) 131.865,42.176 131.865,53.734 v1(132.461,54.331)
IIC_SDA: P9.1 R27.1 U1.27 U5.5 U9.C3 U14.140 | length 246.2
  Top Layer w0.203: v1(24.511,85.801) 24.511,84.836 28.448,80.899 28.448,68.377 29.413,67.412 29.413,58.09 32.664,54.839 32.664,52.934 32.156,52.426 32.156,28.245 33.02,27.381 34.544,27.381 36.826,29.663 P9.1@37.505,29.663 43.938,29.663 44.653,30.378 54,30.378 58.039,34.417 72.161,34.417 77.902,40.157 77.902,43.302 77.729,43.475 U14.140@77.729,45.683 77.749,45.704 77.749,47.617 77.572,47.794 v1(77.572,47.904) ; v1(34.188,91.008) 34.233,91.053 U9.C3@37.014,91.053 ; v1(81.199,47.423) 83.655,47.423 88.195,42.883 97.628,42.883 107.264,33.247 v1(107.264,32.283) ; U1.27@127.806,40.321 129.653,40.321 130.759,41.427 v1(132.537,41.427) ; v1(133.071,55.169) 133.121,55.118 142.859,55.118 144.348,56.607 144.348,57.379 144.844,57.874 145.392,57.874 U5.5@145.608,58.09 145.148,58.09 144.932,58.306 144.932,59.969 R27.1@145.212,60.249
  Bottom Layer w0.203: v1(24.511,85.801) 28.194,85.801 33.401,91.008 v1(34.188,91.008) ; v1(77.572,47.904) 78.384,48.717 79.905,48.717 v1(81.199,47.423) ; v1(107.264,32.283) 107.264,31.521 107.95,30.836 112.674,30.836 113.97,29.54 130.378,29.54 132.537,31.699 v1(132.537,41.427) 132.537,53.442 133.071,53.975 v1(133.071,55.169)
JTCK: JTAG.9 P9.25 R63.1 U14.109 | length 69.5
  Top Layer w0.203: JTAG.9@7.417,59.614 10.846,56.185 R63.1@12.243,56.185 12.243,56.955 12.362,57.074 15.392,57.074 18.288,54.178 v1(23.825,54.178) ; P9.25@37.505,60.143 38.543,59.106 43.088,59.106 53.746,48.447 53.746,47.6 56.972,44.374 62.001,44.374 62.229,44.601 U14.109@62.229,45.683
  Bottom Layer w0.203: v1(23.825,54.178) 24.486,53.518 26.995,53.518 32.38,58.903 36.264,58.903 P9.25@37.505,60.143
JTDI: JTAG.5 P9.24 R40.2 R60.1 U14.110 | length 71.8
  Top Layer w0.203: JTAG.5@7.417,54.534 10.846,51.105 R60.1@12.243,51.105 12.243,52.078 12.362,52.197 16.408,52.197 17.247,53.035 22.733,53.035 23.419,52.349 23.419,50.978 23.571,50.825 24.663,50.825 R40.2@24.689,50.851 v1(24.689,52.866) ; P9.24@34.965,57.603 36.086,58.725 42.082,58.725 56.84,43.967 62.179,43.967 62.729,44.517 U14.110@62.729,45.683
  Bottom Layer w0.203: v1(24.689,52.866) 26.882,52.866 31.619,57.603 P9.24@34.965,57.603
JTDO: JTAG.13 P9.7 R62.1 U8.6 U14.133 U16.5 | length 214.6
  Top Layer w0.203: v1(3.658,75.159) 4.724,75.159 6.121,73.762 6.121,65.989 JTAG.13@7.417,64.694 9.804,64.694 11.074,65.964 R62.1@12.116,65.964 12.116,68.834 16.434,73.152 v1(18.212,73.152) ; v1(26.806,71.746) 26.884,71.668 26.884,71.464 26.924,71.424 26.924,58.191 29.972,55.143 v1(29.972,38.532) ; P9.7@37.505,37.283 44.098,37.283 48.336,33.045 52.874,33.045 56.912,37.084 71.057,37.084 74.11,40.137 74.11,43.833 74.229,43.952 U14.133@74.229,45.683 ; v1(42.824,80.823) 50.521,80.823 55.931,86.233 55.931,88.214 53.873,90.272 53.086,90.272 U8.6@52.883,90.475
  Bottom Layer w0.203: v1(3.658,75.159) 3.658,100.457 7.112,103.911 7.112,108.687 U16.5@6.02,109.779 ; v1(26.806,71.746) 26.187,72.365 18.999,72.365 v1(18.212,73.152) 18.212,74.803 21.565,78.156 30.785,78.156 34.392,81.763 41.885,81.763 v1(42.824,80.823) ; v1(29.972,38.532) 36.257,38.532 P9.7@37.505,37.283
JTMS: JTAG.7 P9.26 R61.1 U14.105 | length 63.8
  Top Layer w0.203: JTAG.7@7.417,57.074 10.846,53.645 R61.1@12.243,53.645 12.243,54.635 12.751,55.143 16.612,55.143 18.237,53.518 24.232,53.518 24.943,54.229 v1(24.943,54.28) ; P9.26@34.965,60.143 36.239,61.417 38.252,61.417 40.03,59.639 43.093,59.639 53.049,49.683 U14.105@59.729,49.683
  Bottom Layer w0.203: v1(24.943,54.28) 27.153,54.28 33.016,60.143 P9.26@34.965,60.143
JTRST: JTAG.3 P9.6 R59.1 U8.2 U14.134 U16.7 | length 211.8
  Top Layer w0.203: v3(3.632,73.101) 3.632,51.308 4.166,50.775 6.198,50.775 JTAG.3@7.417,51.994 10.846,48.565 R59.1@12.243,48.565 12.243,47.727 12.751,47.219 14.91,47.219 15.596,46.533 15.596,44.348 16.18,43.764 22.809,43.764 24.943,41.631 v1(24.943,36.271) ; U16.7@6.02,112.319 6.655,112.954 14.452,112.954 17.526,109.88 17.526,106.689 22.641,101.575 38.862,101.575 39.954,100.482 39.954,94.894 43.105,91.743 U8.2@46.025,91.743 ; P9.6@34.965,34.743 36.264,36.043 44.744,36.043 48.122,32.664 53.031,32.664 57.07,36.703 71.215,36.703 74.491,39.979 74.491,43.503 74.729,43.741 U14.134@74.729,45.683
  Bottom Layer w0.203: v3(3.632,73.101) 4.242,73.711 4.242,100.502 7.493,103.754 7.493,110.846 U16.7@6.02,112.319 ; v1(24.943,36.271) 24.968,36.246 33.463,36.246 P9.6@34.965,34.743
KEY0: KEY0.2 P8.6 U14.3 | length 86.6
  Top Layer w0.203: U14.3@82.229,49.183 82.254,49.158 83.537,49.158 88.669,44.026 98.417,44.026 107.7,34.743 P8.6@108.879,34.743 109.085,34.537 109.811,34.537 110.846,33.503 112.09,33.503 113.563,32.029 113.563,19.355 117.221,15.697 117.221,12.192 118.72,10.693 132.131,10.693 133.883,8.941 133.883,6.657 KEY0.2@133.886,6.655
  Bottom Layer w0.203: KEY0.2@133.886,6.655 KEY0.2@140.386,6.655
KEY1: KEY1.2 P8.3 U14.2 | length 76.9
  Top Layer w0.203: U14.2@82.229,48.683 82.247,48.665 83.491,48.665 88.511,43.645 98.163,43.645 108.28,33.528 110.094,33.528 P8.3@111.419,32.203 111.789,32.203 113.132,30.861 113.132,18.974 116.84,15.265 116.84,10.084 117.856,9.068 122.837,9.068 KEY1.2@125.25,6.655 KEY1.2@131.75,6.655
KEY2: KEY2.2 P8.4 U14.1 | length 71.2
  Top Layer w0.203: U14.1@82.229,48.183 82.251,48.161 83.456,48.161 88.353,43.264 97.96,43.264 109.021,32.203 110.287,30.937 112.243,30.937 112.649,30.531 112.649,13.665 113.308,13.007 115.822,13.007 116.459,12.37 116.459,6.81 KEY2.2@116.614,6.655 KEY2.2@123.114,6.655
LCD_BL: P9.42 TFTLCD.23 U14.76 | length 89.8
  Top Layer w0.203: P9.42@34.976,80.453 36.286,81.763 37.922,81.763 54.432,65.253 v1(55.372,65.253) ; U14.76@59.729,64.183 58.245,64.183 57.607,64.821 v1(57.607,65.303) 57.175,65.735 57.175,72.718 69.806,85.349 69.806,89.427 v1(69.342,89.891)
  Bottom Layer w0.203: v1(55.372,65.253) 57.556,65.253 v1(57.607,65.303) ; v1(69.342,89.891) 69.342,90.094 74.828,95.58 74.828,106.078 TFTLCD.23@80.694,111.944
LED0: DS0.2 P8.17 U14.21 | length 115.4
  Top Layer w0.203: U14.21@82.229,58.183 83.828,58.183 84.379,57.633 88.682,57.633 89.876,56.439 98.597,56.439 103.754,51.283 109.88,51.283 111.18,49.983 P8.17@111.419,49.983 112.598,48.804 112.598,33.858 113.995,32.461 113.995,19.609 118.136,15.468 v1(118.136,12.802) ; DS0.2@88.772,1.576 88.772,6.298 90.475,8.001 101.125,8.001 104.224,4.902 113.558,4.902 114.527,5.872 v1(114.527,12.142)
  Bottom Layer w0.203: v1(114.527,12.142) 115.161,12.776 v1@117.992,12.776
LED1: DS1.2 P8.20 U14.22 | length 111.8
  Top Layer w0.203: U14.22@82.229,58.683 83.867,58.683 84.537,58.014 88.84,58.014 90.034,56.82 98.755,56.82 103.052,52.523 109.249,52.523 110.465,51.308 112.243,51.308 113.157,50.394 113.157,34.061 114.478,32.741 114.478,19.888 118.897,15.469 118.897,11.786 v1(118.923,11.76) ; DS1.2@95.48,1.573 95.48,6.605 96.418,7.544 100.998,7.544 104.021,4.521 113.716,4.521 115.265,6.071 v1(115.265,11.709)
  Bottom Layer w0.203: v1(115.265,11.709) 118.872,11.709 v1(118.923,11.76)